# Altium PCB old(2).PcbDoc (part 2 of 4)
Units mil, origin at the board's own origin, x right, y up, seen from the top; angles counter-clockwise.
Board outline 5000 x 7000 mil, 4 copper layers (Top Layer, Signal Layer 1, Signal Layer 2, Bottom Layer), stack 61.2 mil thick; 559 components, 281 nets, 1477 pads, 685 vias.
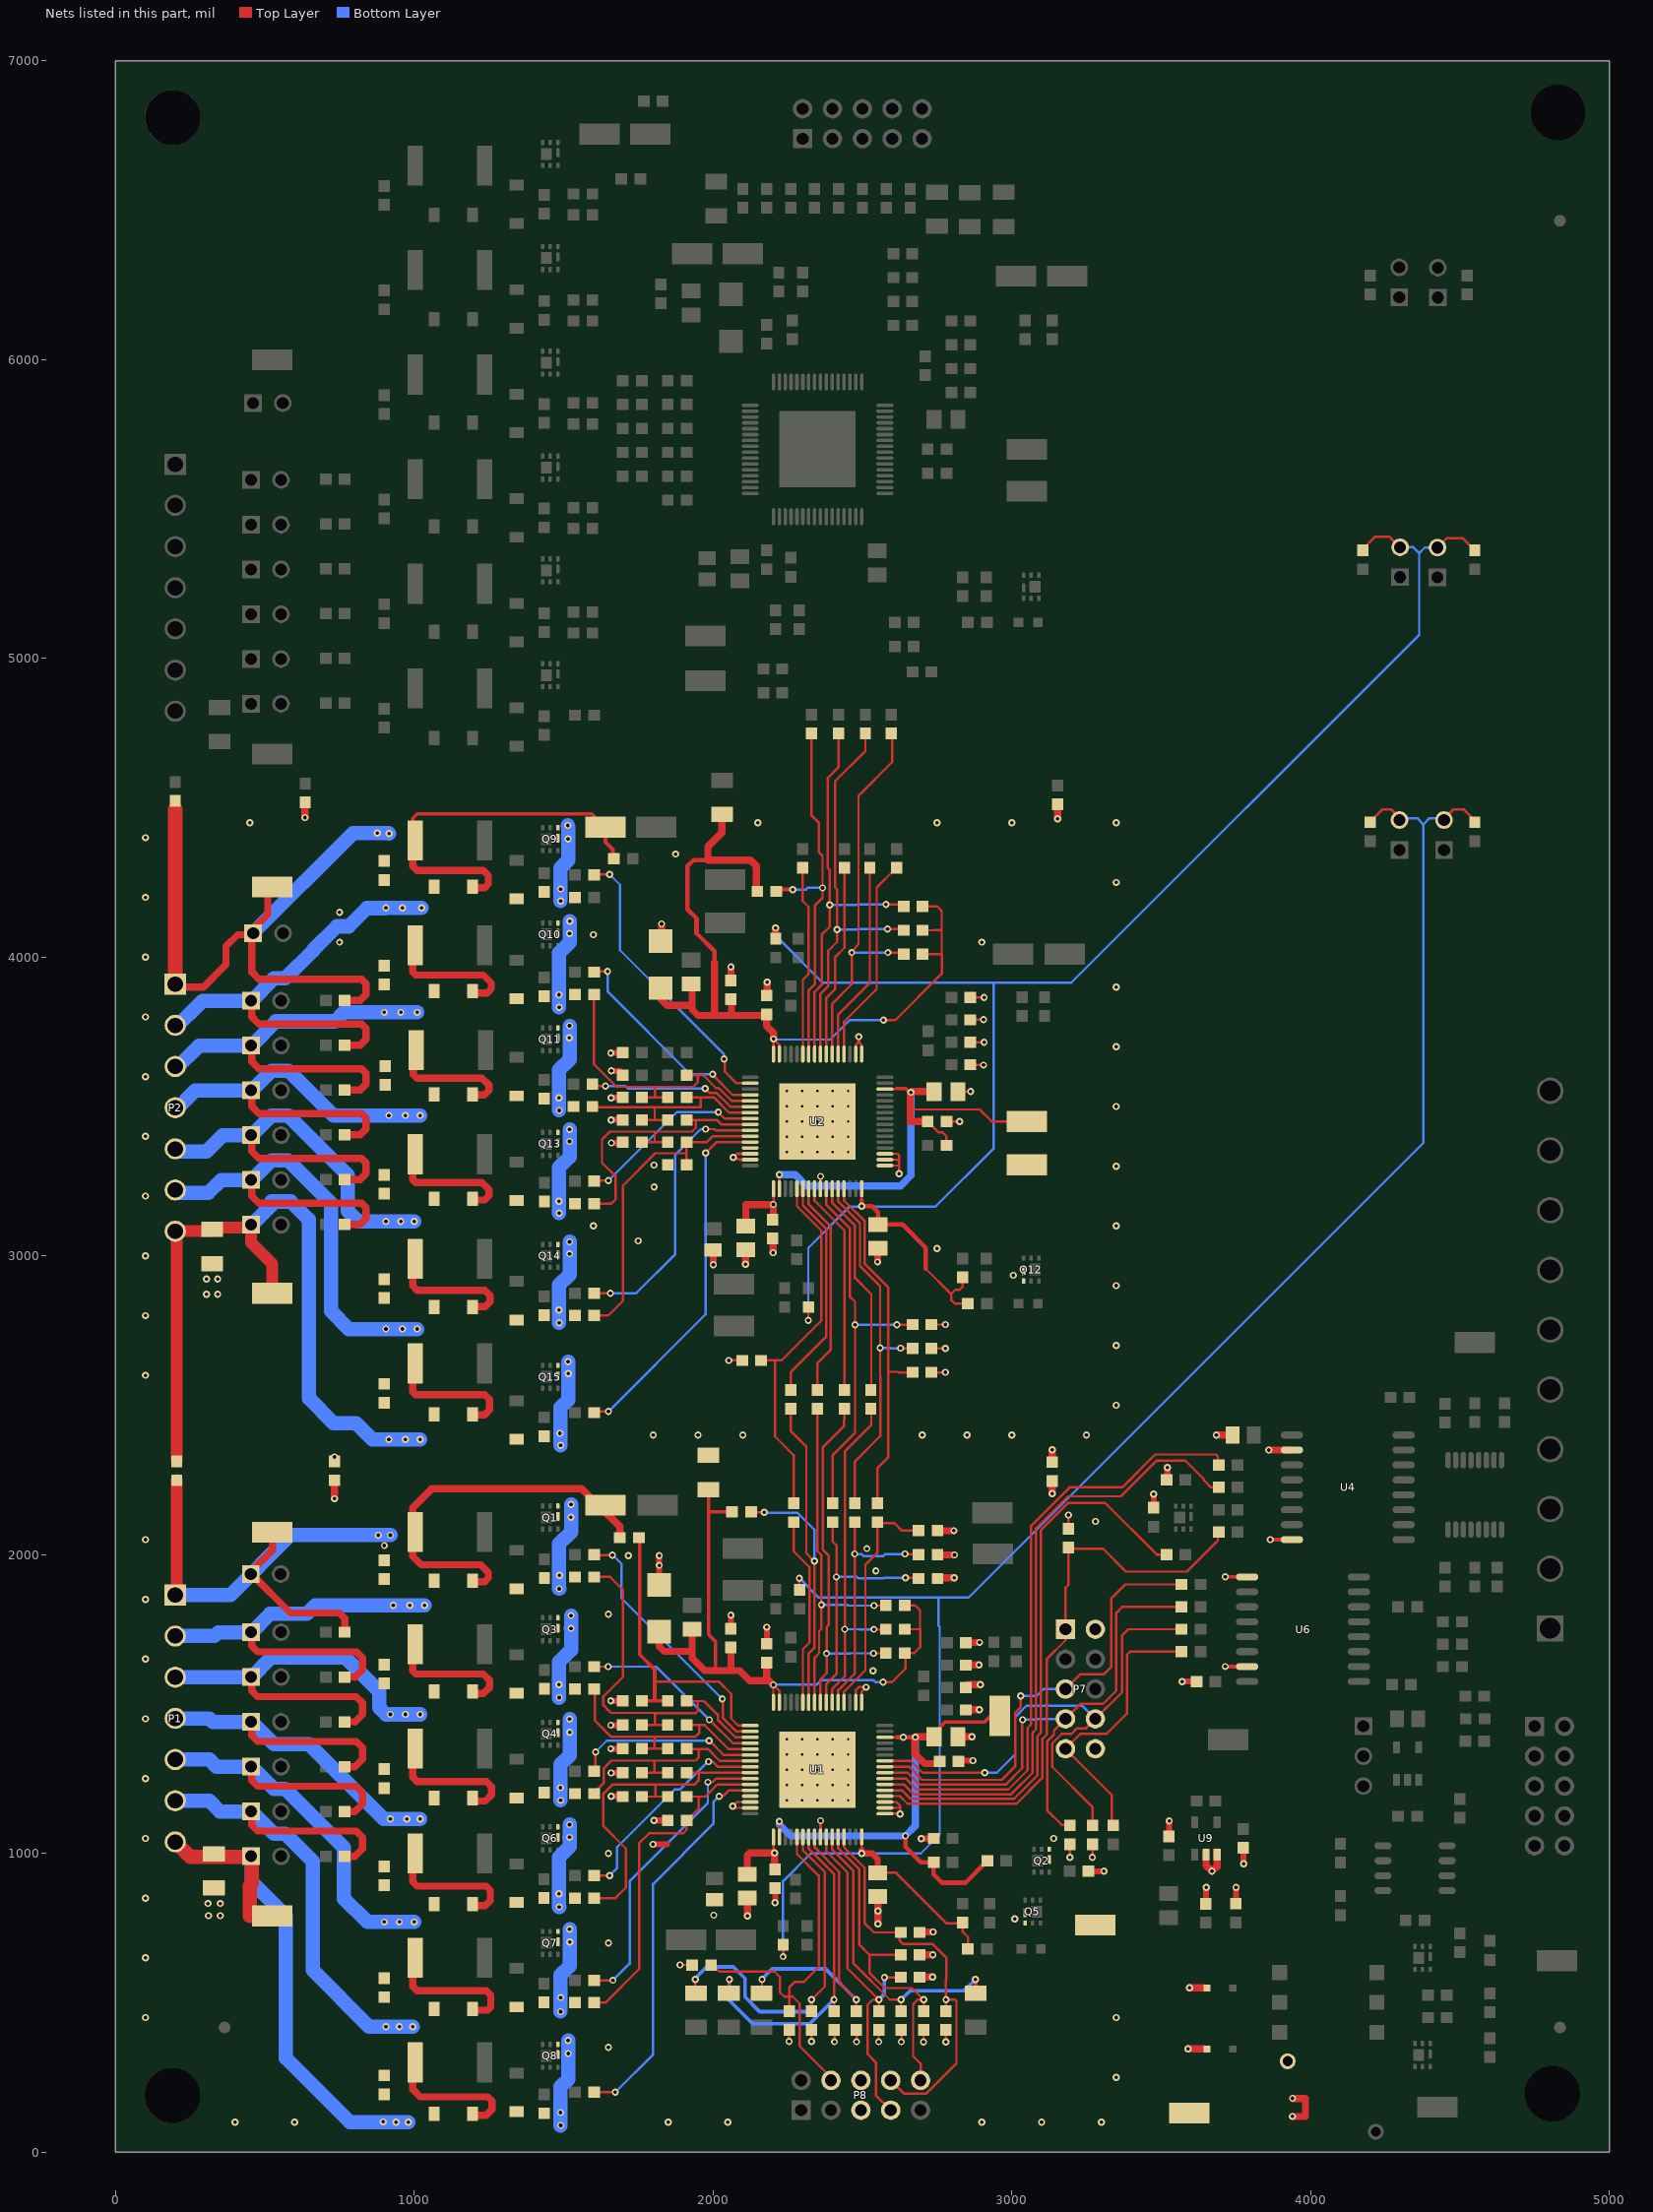
[diagram p4: the nets of this part, all layers, seen from the top]

## Part data
C1 C2 C3 C4 C5 C10 C11 C12 C13 C14 C17 C18 C20 C21 C25 C26 C28 C29 C40 C41 C42 C44 C46 C48 C51 C52 C54 C55 C57 C60 C66 C67 C78 C79 C80 C82 C84 C86 C89 C90 C92 C93 C95 C98 C100 C101 C107 C113 C114 C116 C118 C120 C121 C122 C123 C124 C125 C129 C132 C133: "CAP, CERM, 0.1 µF, 50 V, +/- 10%, X7R, 0603"
C6 C7 C8 C9: "CAP, CERM, 3300 pF, 50 V, +/- 10%, X7R, 0603"
C15 C16 C19 C24 C27 C30 C34 C49 C50 C53 C56 C61 C68 C69 C87 C88 C91 C94 C99 C102 C103: "CAP, CERM, 0.1 µF, 100 V, +/- 10%, X7R, 0603"
C22 C23 C58 C59 C96 C97: "CAP, CERM, 0.047 µF, 16 V, +/- 10%, X7R, 0603"
C31 C32 C33 C70 C71 C72 C104 C105 C106: "CAP, CERM, 0.1 µF, 16 V, +/- 10%, X7R, 0603"
C35 C36 C37 C38 C62 C63 C64 C65 C73 C74 C75 C76 C108 C109 C110 C111: "CAP, CERM, 33 pF, 50 V, +/- 5%, C0G/NP0, 0603"
C39 C77 C112 C126 C135: "CAP, CERM, 10 µF, 10 V, +/- 20%, X7R, 0805"
C43 C45 C47 C81 C83 C85 C115 C117 C119: "CAP, CERM, 2.2 µF, 10 V, +/- 10%, X7R, 0805"
C127: "CAP, CERM, 1 µF, 16 V, +/- 10%, X7R, 0603"
C128 C130 C131 C134: "CAP, CERM, 4.7 µF, 10 V, +/- 10%, X5R, 0603"
C136: "CAP, CERM, 150 pF, 50 V, +/- 5%, C0G/NP0, 0603"
C137: "CAP, CERM, 1000 pF, 3150 V, +80/-20%, E, Radial Disc D7x6mm"
"CAUTION 1": library part IEC_HighVoltage, "IEC 61010-1 High Voltage Warning"
D1 D2 D3: "LED, Yellow, SMD"
D4: "MOSFET, P-CH, -20 V, -20 A, SON 2x2mm"
D5 D6: "Diode, Schottky, 30 V, 0.2 A, SOD-323"
FID1 FID2 FID3: "Fiducial mark.  There is nothing to buy or mount."
H1 H2 H3 H4: "BRD SPT SNAP LOCK SCREW MNT 3/8\""
J1 J2 J3 J4 J5 J6 J7 J8 J9 JP1 JP2 JP3 JP4 JP5 JP6 JP7 JP8 JP9 JP10 JP11 JP12 JP13 JP14 JP15 JP16 JP17 JP18: "Header, 100mil, 2x1, Tin, TH"
JP19: "Header, 100mil, 3x1, Tin, TH"
L1: "Inductor, Wirewound, Ferrite, 10uH, 0.12A, 0.5 ohm, SMD"
LBL1: library part THT-14-423-10, "Thermal Transfer Printable Labels, 0.650\" W x 0.200\" H - 10,000 per roll"
Logo1: library part TI_Logo, "Texas Instrument Corporate Signature"
Logo2: library part Pb-Free
Logo3: library part FCC_disclaimer, "FCC_disclaimer"
P1 P2 P3: "Header(Shrouded), 3.5mm, 7x1,  R/A, TH"
P4 P5 P7 P8: "Header (shrouded), 100mil, 5x2, Gold, TH"
P6: "Header, 5.08mm, 10x1, Tin, TH"
Q1 Q2 Q3 Q4 Q5 Q6 Q7 Q8 Q9 Q10 Q11 Q12 Q13 Q14 Q15 Q16 Q17 Q18 Q19 Q20 Q21 Q22 Q23 Q24: "MOSFET, N-CH, 25 V, 5 A, SON 2x2mm"
R1 R10 R11 R12 R54 R55 R56 R65: "RES, 1.00 k, 1%, 0.25 W, 1206"
R2 R3 R4 R5 R6 R7 R8 R9 R20 R37 R57 R58 R59 R60 R61 R62 R63 R64 R94 R96 R99 R101 R103 R104 R105 R106 R108 R140 R141 R144 R146 R177 R179 R181 R184 R185 R198 R199 R200: "RES, 0, 5%, 0.1 W, 0603"
R13 R14 R15 R16 R17 R18 R30 R31 R32 R33 R34 R35 R47 R48 R49 R50 R51 R52: "RES, 1.0 k, 5%, 0.1 W, 0603"
R19 R29 R36 R46 R53: "RES, 0, 5%, 0.25 W, 1206"
R21 R22 R23 R24 R25 R26 R27 R28 R38 R39 R40 R41 R42 R43 R44 R45 R67 R69 R72 R73 R76 R79 R87 R92 R95 R98 R102 R109 R111 R114 R116 R118 R120 R122 R125 R131 R136 R138 R142 R145 R148 R151 R153 R155 R157 R159 R162 R164 R173 R175 R178 R182 R186 R202 R214: "RES, 1.00 k, 0.1%, 0.1 W, 0603"
R66 R74 R81 R93 R100 R110 R113 R119 R124 R133 R139 R147 R150 R156 R160 R167 R176 R183: "RES, 47, 5%, 1 W, 2512"
R68 R115 R152: "RES, 0, 5%, 0.125 W, 0805"
R70 R75 R80 R82 R83 R196 R207 R208 R209 R211: "RES, 10.0 k, 1%, 0.1 W, 0603"
R71 R78 R90 R97 R107 R112 R117 R121 R129 R137 R143 R149 R154 R158 R163 R174 R180 R187 R190 R191 R192 R195: "RES, 1.0 M, 5%, 0.1 W, 0603"
R77 R123 R161: "RES, 1.6 k, 5%, 0.1 W, 0603"
R84 R85 R127 R128 R165 R166: "RES, 1.47 k, 1%, 0.1 W, 0603"
R86 R126 R135 R168 R172 R204: "RES, 100 k, 1%, 0.1 W, 0603"
R88 R130 R171 R188 R189 R193 R194 R197 R201 R203 R205 R206: "RES, 100, 5%, 0.1 W, 0603"
R89 R91 R132 R134 R169 R170: "RES, 1.82 k, 1%, 0.1 W, 0603"
R210: "RES, 2.00, 1%, 0.1 W, 0603"
R212: "RES, 523 k, 1%, 0.1 W, 0603"
R213: "RES, 169 k, 1%, 0.1 W, 0603"
R215: "RES, 1.0, 5%, 0.1 W, 0603"
RT1 RT2 RT3 RT4 RT5 RT6: "Thermistor NTC, 10.0k ohm, 1%, 0603"
SH-J1 SH-J2 SH-J3 SH-J4 SH-J5 SH-J6 SH-J7 SH-J8 SH-JP1 SH-JP2 SH-JP3 SH-JP4 SH-JP5 SH-JP6 SH-JP7 SH-JP8 SH-JP9 SH-JP10 SH-JP11 SH-JP12 SH-JP13 SH-JP14 SH-JP15 SH-JP16 SH-JP17 SH-JP18 SH-JP19: "Shunt, 100mil, Gold plated, Black"
T1: "Transformer, 400 uH, SMT"
TP1 TP2 TP3 TP4 TP5 TP6 TP-1 TP-2 TP-3 TP-4 TP-5 TP-6 TP-7 TP-8 TP-9 TP-10 TP-11 TP-12 TP-13 TP-14 TP-15 TP-16 TP-17 TP-18 TP-19 TP-AGN TP-C1 TP-C2 TP-C3 TP-C4 TP-C5 TP-C6 TP-SW1 TP-VPROG1 TP-VPROG2 TP-VPROG3 TP-VSS1 TP-VSS2 TP-VSS3 TPTP-VSS1: "Test Point, Miniature, SMT"
TP-20: "LOW PROFILE, TH"
U1 U2 U3: "Lithium-Ion Battery Monitor and Secondary Protection IC for Electric and Hybrid, -40 to 85 degC, 64-pin HTQFP (PAP), Green (RoHS & no Sb/Br)"
U4 U6: "25 Mbps Quad Channels, 3 / 1, Digital Isolator, 3.3 V / 5 V, -40 to +125 degC, 16-pin SOIC (DW), Green (RoHS & no Sb/Br)"
U5: "Remote 8-Bit I2C and SMBus Low-Power I/O Expander with Reset and Configuration Registers, 2.3 to 5.5 V, -40 to 85 degC, 16-pin TSSOP (PW), Green (RoHS & no Sb/Br)"
U7: "Single Output LDO, 100 mA, Fixed 3.3 V Output, 2.7 to 10 V Input, with Low IQ, 5-pin SOT-23 (DBV), -40 to 125 degC, Green (RoHS & no Sb/Br)"
U8: "LOW POWER CURRENT MODE PUSH-PULL PWM, D0008A"
U9: "Ultralow-Power 100-mA Low-Dropout Linear Regulators, DBV0005A"
Z1 Z15 Z27: "Diode, TVS, Bi, 36 V, 400 W, SMA"
Z2 Z3 Z4 Z5 Z6 Z7 Z8 Z9 Z10 Z11 Z12 Z13 Z14 Z16 Z17 Z18 Z19 Z20 Z21 Z22 Z23 Z24 Z25 Z26 Z28 Z29 Z30 Z31 Z32 Z33 Z34 Z35 Z36 Z37 Z38 Z39: "Diode, Zener, 5.6 V, 500 mW, SOD-123"
ZZ1: library part AssemblyNoteLabel
ZZ2 ZZ3 ZZ4 ZZ5: library part AssemblyNote

## Via types
v1: diameter 24, hole 12, Top Layer to Bottom Layer, tented both sides, 607 vias
v2: diameter 19.68, hole 7.87, Top Layer to Bottom Layer, 75 vias
v3: diameter 22, hole 10, Top Layer to Bottom Layer, tented both sides, 3 vias

## Nets (pads, with @x,y where several pads share a name; then routed paths per layer and width w, separated by ;. In a path a pad name is that pad's centre, name@x,y a point inside that pad or via, vN(x,y) a via of type N, cw(c..) or ccw(c..) an arc to the next point about the centre after c; other vN are vias at no path point)
1-ALERT: R189.1 U1.38 | length 2099.8
  Top Layer w8: U1.38@2578.35,1230.79 2638.9,1230.79 2671.68,1198 2998,1198 3069.97,1269.97 3069.97,1403.6 3081.1,1414.73 3081.1,2088.02 3188.08,2195 3365,2195 3485,2315 3580.36,2315 3642.76,2252.6 3642.76,2249.24 3667,2225 R189.1@3690,2225
1-ALERT_N: C37.1 R39.1 U1.57 | length 1205.3
  Top Layer w8: U1.57@2340.16,1508.35 2340.16,1655.08 2355.13,1670.05 2355.13,1743.04 2363.13,1751.04 v1(2363.13,1832.04) 2363.13,1998.23 2350,2011.36 R39.1@2350,2485 ; v1(2538.91,1829.32) 2575,1829.32 C37.1@2575,1830
  Bottom Layer w8: v1(2363.13,1832.04) 2449.66,1832.04 2452.38,1829.32 v1(2538.91,1829.32)
1-ALERT_S: R55.2 R59.2 U1.23 | length 1144.9
  Top Layer w8: R55.2@2053,531.57 2055,533.57 v1(2055,578) ; U1.23@2320.47,1051.65 2320.47,1015.22 2405,930.69 v1(2405,510) R59.2@2405,475
  Bottom Layer w12: v1(2055,578) 2055,507 2132,430 2325,430 v1(2405,510)
1-CB1: R111.1 U1.12 | length 1316.4
  Top Layer w8: R111.1@1601.5,200 1601.72,200.22 v1(1672.75,200.22) ; v1@2022,1193 2036,1193 2054.1,1211.1 U1.12@2124.61,1211.1
  Bottom Layer w8: v1(1672.75,200.22) 1799.55,327.01 1799.55,897.05 2001.53,1099.03 2001.53,1171.96 v1@2020.61,1191.04
  other v1: 2020.96,1190.97
1-CB2: R102.1 U1.10 | length 1009
  Top Layer w8: R102.1@1601.5,575 v1@1664.93,575 ; v1@1979,1238 1998,1238 2010.47,1250.47 U1.10@2124.61,1250.47
  Bottom Layer w8: v1@1664.9,575 1721,631.1 1721,906.02 1982.96,1167.98 v1(1982.96,1237.97)
  other v1: 1664.96,574.97
1-CB3: R95.1 U1.8 | length 725
  Top Layer w8: R95.1@1601.5,925 1602.33,925.83 v1(1654.07,925.83) ; v1@1987,1308 1998,1308 2016.16,1289.84 U1.8@2124.61,1289.84
  Bottom Layer w8: v1(1654.07,925.83) 1679.49,951.25 1679.49,1020.91 1871.81,1213.24 1889.08,1213.24 v1@1982.46,1306.62
  other v1: 1984.96,1306.97
1-CB4: R87.1 U1.6 | length 618.8
  Top Layer w8: R87.1@1601.5,1275 1606.96,1280.46 v1(1606.96,1338.97) ; v1@1988,1377.31 2036.1,1329.21 U1.6@2124.61,1329.21
  Bottom Layer w8: v1@1606.55,1339.16 1644.36,1376.97 v1(1986.96,1376.97)
1-CB5: R76.1 U1.4 | length 628.8
  Top Layer w8: R76.1@1601.5,1625 v1@1648.93,1625 ; v1(1987.96,1446.97) 2066.42,1368.58 U1.4@2124.61,1368.58
  Bottom Layer w8: v1@1649.41,1624.83 1810.1,1624.83 v1(1987.96,1446.97)
  other v1: 1648.96,1624.97
1-CB6: R69.1 U1.2 | length 868.8
  Top Layer w8: R69.1@1601.5,2000 1603.53,1997.97 v1(1662.96,1997.97) ; v1@2032.65,1515.22 2032.65,1453.35 2078.05,1407.95 U1.2@2124.61,1407.95
  Bottom Layer w8: v1@1663.97,1998.87 1693.86,1968.98 1693.86,1854.07 v1(2030.96,1516.97)
1-CELL1: C34.2 C42.1 JP17.1 P1.6 Q7.4 Q7.7 R52.2 R107.1 R109.2 R110.2 Z10.2 Z11.2 Z12.1 | length 2632.2
  Top Layer w24: JP17.1@456,1140 456,1094 475.34,1074.66 805.63,1074.66 826.99,1053.3 826.99,1014.97 801.51,989.49 801,990 R52.2@770,990 ; R110.2@995,300 995,210 1020,185 1246.45,185 1259.94,171.51 1259.94,142.51 1240.14,122.71 1189.5,122.71 Z12.1@1189.5,125
  Bottom Layer w48: P1.6@200,1176.02 313.89,1176.02 349.91,1140 456,1140 531,1065 568.68,1065 660,973.68 660,608.43 848.43,420 v1(905,420) v1(950,420) v1(995,420) ; v1(1490,470) 1490,593 1520,623 1520,702.84 v1(1520.82,702.84) 1520,706 v1(1520,746)
  other v1: 1490.24,517.34
1-CELL2: C28.2 C34.1 JP16.1 P1.5 Q6.4 Q6.7 R51.2 R97.1 R98.2 R100.2 Z8.2 Z9.2 Z10.1 | length 2434.2
  Top Layer w24: JP16.1@456,1290 456,1244 475.34,1224.66 805.63,1224.66 826.99,1203.3 826.99,1164.97 801.51,1139.49 801,1140 R51.2@770,1140 ; R100.2@995,650 995,555 1010,540 1241.45,540 1256.21,525.24 1256.21,485.78 1245.43,475 Z10.1@1189.5,475
  Bottom Layer w48: P1.5@200,1313.81 313.89,1313.82 337.71,1290 456,1290 531,1215 568.68,1215 765,1018.68 765,848.43 843.43,770 v1(900,770) v1(950,770) v1(1000,770) ; v1(1485.15,820.54) 1485,824 1485,987 1520,1022 1520,1053.48 v1(1519.89,1053.48) 1520,1056 v1(1520,1096)
  other v1: 1484,864
1-CELL3: C25.2 C28.1 JP15.1 P1.4 Q4.4 Q4.7 R50.2 R90.1 R92.2 R93.2 Z6.2 Z7.2 Z8.1 | length 2257.2
  Top Layer w24: JP15.1@456,1440 456,1394 475.34,1374.66 805.63,1374.66 826.99,1353.3 826.99,1314.97 801.51,1289.49 801,1290 R50.2@770,1290 ; R93.2@995,1000 995,905 1010,890 1241.45,890 1254.55,876.9 1254.55,841.55 1238,825 Z8.1@1189.5,825
  Bottom Layer w48: P1.4@200,1451.61 313.89,1451.61 325.5,1440 456,1440 531,1365 647.44,1365 897.44,1115 v1(920,1115) v1(975,1115) v1(1020,1115) ; v1(1490,1177) 1490,1298 1520,1328 v1(1520,1449)
  other v1: 1489.5,1219.45 1520.15,1405.14
1-CELL4: C20.2 C25.1 JP14.1 P1.3 Q3.4 Q3.7 R49.2 R78.1 R79.2 R81.2 Z4.2 Z5.2 Z6.1 | length 2266.3
  Top Layer w24: JP14.1@456,1590 456,1544 475.34,1524.66 805.63,1524.66 826.99,1503.3 826.99,1464.97 801.51,1439.49 801,1440 R49.2@770,1440 ; R81.2@995,1350 995,1255 1010,1240 1241.45,1240 1258.28,1223.17 1258.28,1195.28 1238,1175 Z6.1@1189.5,1175
  Bottom Layer w48: P1.3@200,1589.41 331.6,1589.41 332.19,1590 456,1590 521,1655 770,1655 883,1542 883,1487.19 905.19,1465 v1(920,1465) v1(970,1465) v1(1020,1465) ; v1(1485,1521) 1485,1641 1525,1681 1525,1753.17 v1(1524.74,1753.17) 1525,1756 v1(1525,1796)
  other v1: 1484.41,1564.58
1-CELL5: C17.2 C20.1 JP13.1 P1.2 Q1.4 Q1.7 R48.2 R71.1 R72.2 R74.2 Z2.2 Z3.2 Z4.1 | length 2161.2
  Top Layer w24: JP13.1@456,1740 456,1694 475.34,1674.66 805.63,1674.66 826.99,1653.3 826.99,1614.97 801.51,1589.49 801,1590 R48.2@770,1590 ; R74.2@995,1700 995,1610 1005,1600 1231.45,1600 1251.65,1579.8 1251.65,1555.16 1231.35,1534.86 Z4.1@1199.36,1534.86
  Bottom Layer w48: P1.2@200,1727.2 331.6,1727.2 344.4,1740 456,1740 518,1802 640.34,1802 668.34,1830 v1(930,1830) v1(985,1830) v1(1035,1830) ; v1(1485.26,1885.34) 1485,1890 1485,2036 1525,2076 v1(1525,2168)
  other v1: 1486,1931 1524.45,2124.9
1-CELL6: C17.1 J1.1 P1.1 R37.1 R47.2 R66.2 R67.2 TP5.1 TP-C1.1 Z2.1 | length 3101.4
  Top Layer w24: J1.1@453,1935 453,1943 525,2015 TP5.1@525,2075 ; J1.1@455,1935 585.48,1804.52 750,1804.52 768.09,1786.43 768.09,1740 R47.2@770,1740 ; R66.2@995,2075 995,1994 1022.75,1966.25 1222.57,1966.25 1248.03,1940.78 1248.03,1921.31 1236.02,1909.3 Z2.1@1198.8,1909.3
  Top Layer w25: R66.2@995,2075 995,2156.5 1058.5,2220 1560,2220 1615,2165 1617,2165 1688.52,2093.48 R67.2@1688.52,2056.75
  Top Layer w40: P1.1@200,1865 205,1870 R37.1@205,2248.5
  Bottom Layer w48: P1.1@200,1865 385,1865 585,2065 v1(880,2065) v1(920,2065)
  other v1: 900,2030
1-CONV: P7.1 R83.1 R194.1 U1.36 | length 1977.4
  Top Layer w8: U1.36@2578.35,1191.42 2625.37,1191.42 2650.79,1166 3016,1166 3101.97,1251.97 3101.97,1382.55 3117.77,1398.35 3117.77,1650.7 3180,1712.93 P7.1@3180,1750 3180,1888.75 3190,1898.75 3190,2020 3305,2020 3382.18,1942.82 3585.82,1942.82 3690,2047 R194.1@3690,2075
1-CONV_N: R42.1 U1.59 | length 627.8
  Top Layer w8: R42.1@2270,2105 2270,2011.16 2323,1958.16 2323,1705.62 2300.79,1683.41 U1.59@2300.79,1508.35
1-CONV_S: C10.1 P8.4 R57.2 U1.21 | length 1345.7
  Top Layer w8: C10.1@1993.5,626 1999,626 2021,604 2206,604 2224,586 2224,535 2239,520 2255,520 ; R57.2@2255,475 2255,520 ; U1.21@2281.1,1051.65 2281.1,997.99 2354,925.1 2354,619 2305,570 2275,570 2255,550 2255,520 ; P8.4@2395,240 2395,250 2290,355 2290,497 2267,520 2255,520
1-CS_N: R45.1 R105.2 U1.52 | length 788.2
  Top Layer w8: U1.52@2438.58,1508.35 2438.58,1541 2510.12,1612.54 2510.12,1966.02 2550,2005.91 2550,2105 2607.5,2105 2632.5,2080 R105.2@2685,2080
1-CS_S: C13.1 P8.8 R64.2 U1.29 | length 1353.1
  Top Layer w8: U1.29@2438.58,1051.65 2438.58,1020.36 2507,951.94 2507,767 2539,735 2625,735 2625,707 2636.31,695.69 2735.74,695.69 2780.58,650.85 2780.58,580 2780,579.42 v1(2780,510) ; P8.8@2595,240 2640,195 2712.93,195 2815,297.07 2815,505 2810,510 v1(2780,510) ; R64.2@2780,475 v1(2780,510)
1-DRDY: R196.1 U1.37 | length 1905.2
  Top Layer w8: U1.37@2578.35,1211.1 2632.42,1211.1 2661.53,1182 3007,1182 3085.97,1260.97 3085.97,1391.82 3097.1,1402.95 3097.1,2081.43 3189.02,2173.35 3311.66,2173.35 3485.01,2000 R196.1@3515,2000
1-DRDY_N: C38.1 R38.1 U1.58 | length 1357.3
  Top Layer w8: C38.1@2130.67,2142.55 2130.67,2141.06 v1(2171.82,2141.06) ; R38.1@2260,2485 2260,2413.7 2312.5,2361.21 2312.5,2004.66 v1(2339.13,1978.02) 2339.13,1687.91 2320.47,1669.24 U1.58@2320.47,1508.35
  Bottom Layer w8: v1(2171.82,2141.06) 2171.82,2139.7 2283,2139.7 2339.13,2083.57 v1(2339.13,1978.02)
1-DRDY_S: R54.2 R58.2 U1.22 | length 1208.7
  Top Layer w8: v1(1941,578) 1941,534.57 R54.2@1943,532.57 ; U1.22@2300.79,1051.65 2300.79,1010.44 2374,937.23 2374,554 v1(2330,510) R58.2@2330,475
  Bottom Layer w12: v1(1941,578) 1941,582 1979,620 2068,620 2107,581 2107,519 2156,470 2313,470 2330,487 v1(2330,510)
1-FAULT: R188.1 U1.39 | length 2094.3
  Top Layer w8: U1.39@2578.35,1250.47 2644.95,1250.47 2681.42,1214 2989,1214 3053.2,1278.2 3053.2,1419.71 3065.1,1431.61 3065.1,2096.38 3193.72,2225 3370,2225 3480,2335 3683,2335 3690,2328 R188.1@3690,2300
1-FAULT_N: C36.1 R40.1 U1.56 | length 1221.4
  Top Layer w8: U1.56@2359.84,1508.35 2359.84,1582.4 2380.13,1602.68 v1(2380.13,1669.05) 2380.13,1757.04 2387.13,1764.04 2387.13,1996.86 2368,2015.99 2368,2359.86 2439.12,2430.98 2439.12,2452.05 2440,2452.93 R40.1@2440,2485 ; v1(2537.09,1669.32) 2575,1669.32 C36.1@2575,1670
  Bottom Layer w8: v1(2380.13,1669.05) 2458.48,1669.05 2458.75,1669.32 v1(2537.09,1669.32)
1-FAULT_S: R56.2 R60.2 U1.24 | length 1055.2
  Top Layer w8: R56.2@2163,531.57 2164,532.57 v1(2164,578) ; U1.24@2340.16,1051.65 2340.16,1020 2421.61,938.55 2421.61,568.39 v1(2480,510) R60.2@2480,475
  Bottom Layer w12: v1(2164,578) 2164,579 2198,613 2377,613 v1(2480,510)
1-LDOA: C44.1 C45.1 U1.17 | length 259.3
  Top Layer w8: v1@2202.36,1001.21 U1.17@2202.36,1051.65
  Top Layer w24: C45.1@2115,930 2115,992.77 2123.44,1001.21 2202.36,1001.21 v1(2205.7,1001.21) 2205.7,950 C44.1@2205,950
1-LDOD1: C46.1 C47.1 R70.2 R94.2 TP-VPROG1.1 U1.18 U1.46 | length 1845.4
  Top Layer w8: v1(2222,1107) v1(2222,1107) U1.18@2222.05,1054.61 ; U1.46@2575.39,1388.27 2616.11,1388.27
  Top Layer w12: C47.1@2740,1390 2740,1402.23 2777.77,1440 2910,1440 TP-VPROG1.1@2960,1490
  Top Layer w15: v1(2643.85,1058.21) 2643.85,1021.75 2695.6,970 R94.2@2738.5,970 2738.5,929.58 2766.62,901.46 2844.96,901.46 R70.2@2918.5,975
  Top Layer w16: 2616.11,1388.27 2636.56,1388.27 v1(2637,1388) 2636.56,1388.32 2636.56,1388.46 v1@2670.48,1388.46 ; v1@2676,1384.02 2671.02,1389 v1(2677,1389)
  Top Layer w24: v1@2676,1384.02 2676,1332.22 2708.22,1300 C46.1@2755,1300 ; v1(2677,1389) 2678,1390 C47.1@2740,1390
  Bottom Layer w24: v1(2222,1107) 2222,1097.03 2260.82,1058.21 v1(2643.85,1058.21) 2677,1091.36 v1(2677,1389)
1-REG50: C22.1 C23.1 C43.1 J2.2 J3.2 R77.2 R86.2 RT1.2 RT2.2 U1.32 | length 6598.8
  Top Layer w8: v1(2234.61,654.07) 2234.61,693.11 C22.1@2235,693.5 ; v1(2289,1921) 2289,1884.5 2291,1882.5 C23.1@2290,1881.5 ; U1.32@2497.64,1054.61 2497.77,1054.47 v1@2497.77,1009.77 ; C43.1@2551,935 2612.5,935 2782.5,765 R86.2@2835,765 ; R86.2@2835,768.5 R86.2@2835,765 ; R77.2@2853.5,680 2853.5,719.5 2835,738 R86.2@2835,765 ; RT2.2@4200,4440 4200,4454 4240,4494 4271,4494 J3.2@4300,4465 ; J2.2@4449.15,4465.85 4477.31,4494 4514,4494 4550,4458.01 RT1.2@4550,4440
  Top Layer w20: v1@2497.77,1009.77 v1(2497.77,999.51) 2532.49,999.51 2551,981 C43.1@2551,935
  Top Layer w24: C23.1@2290,1877 C23.1@2291.03,1877
  Bottom Layer w8: v1(2234.61,654.07) 2234.61,906.67 2327.45,999.51 v1(2497.77,999.51) 2695.51,999.51 2759,1063 2759,1758.81 2754.53,1763.28 2754.53,1856.04 ; v1(2289,1921) 2353.96,1856.04 2754.53,1856.04 ; J3.2@4300,4465 4359.43,4465 4377.62,4443.77 ; J2.2@4450,4465 4398.85,4465 4377.62,4443.77 ; 2754.53,1856.04 2855.46,1856.04 4377.62,3378.2 4377.62,4443.77
1-SCLK_N: R43.1 R103.2 U1.55 | length 892.8
  Top Layer w8: U1.55@2379.53,1508.35 2379.53,1566.62 2413.13,1600.22 v1(2413.13,1925.03) 2413.13,2031.18 2400,2044.31 R43.1@2400,2105 ; v1(2644.1,1922.03) 2685,1922.03 R103.2@2685,1920
  Bottom Layer w8: v1(2413.13,1925.03) 2482.08,1925.03 2487.11,1920 2570.01,1920 2572.04,1922.03 v1(2644.1,1922.03)
1-SCLK_S: C11.1 P8.7 R61.2 U1.26 | length 1212.6
  Top Layer w8: U1.26@2379.53,1051.65 2379.53,1006.34 2450,935.86 2450,615 v1(2555,510) ; R61.2@2555,475 v1(2555,510) ; v1(2574.05,584.02) 2625,584.02 C11.1@2625,585 ; P8.7@2595,140 2545,190 2545,300 2517.42,327.58 2517.42,492.42 2535,510 v1(2555,510)
  Bottom Layer w12: v1(2555,510) 2574.05,529.05 v1(2574.05,584.02)
1-SDI_N: R44.1 R104.2 U1.53 | length 838.6
  Top Layer w8: U1.53@2418.9,1508.35 2418.9,1545.92 2474.12,1601.14 v1(2474.12,2002.02) 2474.12,2051.57 2475,2052.45 R44.1@2475,2105 ; v1(2643.1,2002.02) 2685,2002.02 R104.2@2685,2000
  Bottom Layer w8: v1(2474.12,2002.02) 2496.58,2002.02 2503.6,1995 2570.01,1995 2577.03,2002.02 v1(2643.1,2002.02)
1-SDI_S: C12.1 P8.10 R63.2 U1.28 | length 1156.1
  Top Layer w8: U1.28@2418.9,1051.65 2418.9,1017.37 2489.82,946.45 2489.82,694.02 2523.84,660 ; C12.1@2625,660 2523.84,660 ; P8.10@2695,240 2695,295.78 2670,320.78 2670,495 2685,510 v1(2705,510) ; R63.2@2705,475 v1(2705,510) ; 2523.84,660 2523.84,600.29 2575.13,549 2666,549 v1(2705,510)
1-SDO_N: C35.1 R41.1 U1.54 | length 1165
  Top Layer w8: U1.54@2399.21,1508.35 2399.21,1550.84 2441.12,1592.75 v1(2441.12,1750.04) 2441.12,2344.65 2530,2433.53 R41.1@2530,2485 ; v1(2538.46,1749.78) 2575,1749.78 C35.1@2575,1750
  Bottom Layer w8: v1(2441.12,1750.04) 2489.66,1750.04 2489.92,1749.78 v1(2538.46,1749.78)
1-SDO_S: R62.2 R65.2 U1.27 | length 1017.8
  Top Layer w8: U1.27@2399.21,1051.65 2399.21,1012.36 2470,941.57 2470,631.5 2591.5,510 v1(2630,510) R62.2@2630,475
  Top Layer w12: v1(2878,578) 2879,577 R65.2@2879,531.57
  Bottom Layer w12: v1(2630,510) 2660,540 2840,540 v1(2878,578)
1-SPI-MISO: P7.5 R206.2 U1.41 | length 1536.5
  Top Layer w8: U1.41@2578.35,1289.84 2656.17,1289.84 2700.01,1246 2966,1246 3012.19,1292.19 3012.19,1471.41 3030.42,1489.64 v1(3030.42,1526.65) ; P7.5@3180,1550 3230,1600 3309,1600 3332.47,1623.47 3332.47,1852.47 3380,1900 R206.2@3565,1900
  Bottom Layer w8: v1(3030.42,1526.65) 3083.29,1526.65 3106.64,1550 P7.5@3180,1550
1-SPI-MOSI: P7.8 R82.1 R201.2 U1.42 | length 1932.5
  Top Layer w8: U1.42@2578.35,1309.53 2661.93,1309.53 2701.46,1270 v1(2910.15,1270) ; R82.1@3265,1095 3270,1100 3270,1155.03 3135.5,1289.53 3135.5,1368.43 3167.07,1400 3200.15,1400 3218.83,1418.68 3248.68,1418.68 P7.8@3280,1450 3370,1540 3370,1730 3390,1750 R201.2@3565,1750
  Bottom Layer w8: v1(2910.15,1270) 2950,1270 3010.97,1330.97 3010.97,1455.6 3049.87,1494.5 3235.5,1494.5 P7.8@3280,1450
1-SPI-SCLK: P7.7 R80.1 R203.2 U1.40 | length 1923.9
  Top Layer w8: U1.40@2578.35,1270.16 2651.01,1270.16 2691.17,1230 2980,1230 3035,1285 3035,1445.69 v1(3036.44,1447.13) ; R80.1@3195,1095 3167,1095 3119.5,1142.5 3119.5,1376.02 3141.15,1397.67 3141.15,1411.15 P7.7@3180,1450 3230,1500 3305,1500 3349.97,1544.97 3349.97,1804.97 3370,1825 R203.2@3565,1825
  Bottom Layer w8: v1(3036.44,1447.13) 3083.29,1447.13 3086.16,1450 P7.7@3180,1450
1-SPI-SS: P7.9 R73.1 R197.2 | length 954.2
  Top Layer w8: R73.1@3335,1095 3335,1195 P7.9@3180,1350 3230,1400 3318,1400 3386,1468 3386,1665 3396,1675 R197.2@3565,1675
1-VBAT: C16.1 C35.2 C36.2 C37.2 C38.2 C41.1 R46.1 R68.2 U1.63 U1.64 Z1.2 | length 2336.9
  Top Layer w8: U1.64@2202.36,1508.35 2201.91,1508.8 v1(2201.91,1564.12) 2222.05,1543.98 U1.63@2222.05,1508.35 ; v1(2569.42,1572.72) 2598.46,1572.72 2645,1619.26 2645,1670 2673.68,1670 2693.45,1689.78 2693.45,1749.78 2693,1750.23 ; C35.2@2645,1750 2645,1750.23 2693,1750.23 ; C37.2@2645,1830 2676.41,1830 2693,1813.41 2693,1750.23
  Top Layer w12: 1985,2142.55 C38.2@2060.67,2142.55 ; R46.1@1985,2217.91 1985,1732.34 2008.94,1708.4 2008.94,1611.69
  Top Layer w24: Z1.2@1820,1750.5 1820,1692.33 1836.19,1676.14 1930,1676.14 ; R68.2@1930,1755 1930,1676.14 ; C16.1@2060,1685 2060,1611.69 ; C41.1@2180,1635 2180,1585.32 ; v1(2201.91,1564.12) 2201.55,1563.77 2180,1585.32 ; 1930,1676.14 1930,1653.87 1972.18,1611.69 2008.94,1611.69 2060,1611.69 ; 2060,1611.69 2089,1611.69 2122.69,1578 2180,1578 2180,1585.32
  Bottom Layer w8: v1(2201.91,1564.12) 2347.11,1564.12 2362.99,1580 2537,1580 2544.28,1572.72 v1(2569.42,1572.72)
1-VC0: C8.1 C9.2 C10.2 C11.2 C12.2 C13.2 C14.2 C16.2 C18.2 C21.2 C26.2 C29.2 C31.2 C32.2 C39.2 C40.2 C41.2 C42.2 C43.2 C44.2 C45.2 C46.2 C47.2 C120.2 C123.2 C130.2 C131.2 C132.2 C135.2 C137.2 D5.2 D6.2 JP18.1 P1.7 P7.2 P7.10 P8.5 P8.6 Q2.4 Q2.7 Q5.4 Q5.7 Q8.4 Q8.7 R53.1 R53.2 R57.1 R58.1 R59.1 R60.1 R61.1 R62.1 R63.1 R64.1 R75.1 R80.2 R82.2 R83.2 R96.1 R101.2 R103.1 R104.1 R105.1 R108.2 R112.1 R202.1 R213.1 TP6.1 TP-VSS1.1 TP-VSS3.1 U1.13 U1.14 U1.15 U1.25 U1.33 U1.34 U1.35 U1.49 U1.50 U1.65 U4.2 U4.8 U6.9 U6.15 U9.2 U9.3 Z1.1 Z12.2 Z13.2 | length 5491.2
  Top Layer w8: v1(1890.07,626.39) 1926,626.39 C10.2@1926,626 ; U1.15@2124.61,1152.05 2071.95,1152.05 v1(2066,1158) 2079.73,1171.73 U1.14@2124.61,1171.73 ; v1(2254.61,370.07) R57.1@2254.61,406 ; v1(2329.61,370.07) R58.1@2329.61,406 ; v1(2406.61,369.07) R59.1@2406.61,405 ; U1.50@2477.95,1505.39 2477.95,1545.95 2488,1556 v1(2513,1556) 2497.64,1540.64 U1.49@2497.64,1505.39 ; v1(2480.61,369.07) R60.1@2480.61,405 ; v1(2554.61,369.07) R61.1@2554.61,405 ; U1.33@2575.39,1132.36 v1@2624.64,1132.36 ; U1.34@2575.39,1152.05 2623.95,1152.05 2624.64,1151.36 ; U1.35@2575.39,1171.73 2614.27,1171.73 2626,1160 v1(2626,1131) ; v1(2630.61,369.07) R62.1@2630.61,405 ; v1(2704.61,368.07) R63.1@2704.61,404 ; v1(2779.61,368.07) R64.1@2779.61,404 ; R83.2@3190,2090 v1(3190,2132.48) ; v1(3194.93,986.71) 3194.93,1025 R80.2@3195,1025 ; v1(3269.93,986.71) 3269.93,1025 R82.2@3270,1025
  Top Layer w10: U1.25@2359.84,1054.61 2359.84,1108.84 v1(2360,1109)
  Top Layer w12: v1(3714.8,1625.2) 3714.9,1625.1 U6.15@3785.4,1625.1 ; v1(3714.8,1925.2) 3714.9,1925.1 U6.9@3785.4,1925.1 ; v1(3865,2050) 3865.1,2049.9 U4.8@3935.6,2049.9
  Top Layer w20: v1(1658,1350) C21.2@1700.5,1350 ; v1(1658,1429) C18.2@1700.5,1429 ; v1(1658,1510) C14.2@1700.5,1510 ; v1(1659,1191) C29.2@1701.5,1191 ; v1(1659,1269) C26.2@1701.5,1269 ; v1(1799.52,1030) 1845.5,1030 ; v1(1802.52,1110) C40.2@1848.5,1110 ; Z1.1@1820,1898.74 v1(1820,1964) v1(1820,1996) ; C39.2@2003,842.57 C39.2@2005,844.57 ; C16.2@2060,1751.5 v1(2060,1797) ; C41.2@2180,1704.43 v1(2180,1757) ; v1(2208,835) C44.2@2208,883.5 ; v1(2697,1049) 2737.5,1049 R96.1@2738.5,1050 ; C46.2@2821.5,1308 2823.5,1310 v1(2870,1310) ; R75.1@3256.5,940 v1(3309,940) ; C120.2@3475,2156.5 v1(3475,2202) ; R202.1@3518.5,2250 3521,2252.5 v1(3521,2291) ; C130.2@3526,1056.5 3527,1057.5 v1(3527,1108) ; v1(3570,1575) C123.2@3618.5,1575 ; C132.2@3650,830.5 3651,831.5 v1(3651,886) ; C131.2@3750,831.5 3751,832.5 v1(3751,886) ; R213.1@3775,1018.5 3776,1017.5 v1(3776,965)
  Top Layer w24: v1(733,2187) 733,2222 ; C45.2@2115,850 2115.21,850 v1(2115.21,790.72) ; v1(2552,764) v1(2552,807) C43.2@2552,858 ; C11.2@2686.31,585.97 v1(2734.74,585.97) ; C12.2@2687.31,659.97 v1(2735.74,659.97) ; C13.2@2688.31,736.97 v1(2736.74,736.97) ; R105.1@2758,2081 2758,2079.97 v1(2806.43,2079.97) ; R103.1@2759,1923.2 2759,1922.17 v1(2807.43,1922.17) ; R104.1@2760,2000 2760,1998.97 v1(2808.43,1998.97) ; C47.2@2820,1390 2820,1389.76 v1(2866.76,1389.76) v1@2866.76,1390.04 ; R108.2@2842,1557 2842,1555.97 2851.03,1565 v1(2895,1565) ; R101.2@2842,1632 2842,1630.97 v1(2890.43,1630.97) ; C31.2@2843,1482 2843,1480.97 v1(2891.43,1480.97) ; C32.2@2844,1707 2844,1705.97 v1(2892.43,1705.97) ; v1@3135,2203 C9.2@3135.04,2243 ; v1(3590,345) D5.2@3642.5,345 ; v1(3595,550) D6.2@3642.5,550 ; U9.2@3650,1005 3650,960 v1(3670,940) 3685,955 3687,955 U9.3@3687,1005 ; v1(3685,2400) C135.2@3735,2400 ; v1(3860,2350) 3860.1,2349.9 U4.2@3935.6,2349.9 ; v1(3939.3,119.12) 3983.5,119.12 3983.5,179.39 3940.07,179.39 v1(3940.07,179.64)
  Top Layer w48: P1.7@200,1038.22 250.23,988 456,988 456,896.75 450,890.75 450,790
  Bottom Layer w48: JP18.1@456,990 456,904.32 570,790.32 570,315 785,100 v1(939,100) v1(980,100) ; v1(1490,89) 1490,219 1515,244 v1(1515,373)
  other v1: 400,100 600,100 1850,100 2050,100 2900,100 3100,100 3300,100 896,101 1489.84,132.25 3350,250 1515.19,329.82 1650,350 100,450 3350,450 100,650 1650,700 3010,780 311,791 351,791 2002.52,793 310,832 351,832 100,850 1650,1000 100,1050 3140,1050 100,1250 100,1450 100,1650 1650,1800 100,1850 1717,1996 100,2050 3280.82,2111.15 3135,2204
  other v2: 2247.64,1177.64 2298.82,1177.64 2350,1177.64 2401.18,1177.64 2452.36,1177.64 2247.64,1228.82 2298.82,1228.82 2350,1228.82 2401.18,1228.82 2452.36,1228.82 2247.64,1280 2298.82,1280 2350,1280 2401.18,1280 2452.36,1280 2247.64,1331.18 2298.82,1331.18 2350,1331.18 2401.18,1331.18 2452.36,1331.18 2247.64,1382.36 2298.82,1382.36 2350,1382.36 2401.18,1382.36 2452.36,1382.36
1-VC1: C30.2 C40.1 R109.1 U1.11 | length 1154.7
  Top Layer w8: R109.1@1601.5,500 1640,500 1752.42,612.42 1752.42,1032.82 1786.08,1066.48 1899.48,1066.48 1911.5,1078.5 C40.1@1911.5,1110 1912.45,1110 1952,1149.55 1952,1190 ; C30.2@1911.5,1190 1952,1190 ; U1.11@2124.61,1230.79 2014.95,1230.79 1974.17,1190 1952,1190
1-VC2: C27.2 C29.1 C30.1 R98.1 U1.9 | length 1153.1
  Top Layer w8: R98.1@1605,850 1673.26,850 1708.43,885.17 1708.43,1016.24 1633.31,1091.35 1633.31,1199.94 1663.2,1229.83 1807.29,1229.83 1938.06,1229.83 1952.12,1243.89 1952.12,1270.33 ; C29.1@1765,1190 1806.73,1190 ; 1806.73,1229.27 1806.73,1190 ; C30.1@1845,1190 1806.73,1190 ; C27.2@1915,1270.33 1952.12,1270.33 ; 2028.96,1270.33 1952.12,1270.33 ; 2029.13,1270.16 U1.9@2121.65,1270.16
1-VC3: C24.2 C26.1 C27.1 R92.1 U1.7 | length 803.3
  Top Layer w8: R92.1@1605,1200 1605,1206 1635,1236 1635,1284.94 1660.32,1310.26 1805.89,1310.26 1942.28,1310.26 1952.12,1320.1 1952.12,1349.35 ; C26.1@1765,1270 1804.48,1270 ; 1804.48,1308.86 1804.48,1270 ; C27.1@1845,1270 1804.48,1270 ; C24.2@1915,1349.35 1952.12,1349.35 ; U1.7@2124.61,1309.53 2022.96,1309.53 1983.13,1349.35 1952.12,1349.35
1-VC4: C19.2 C21.1 C24.1 R79.1 U1.5 | length 867.5
  Top Layer w8: R79.1@1605,1550 1605,1443.57 1646.13,1402.45 1658.17,1390.41 1941.44,1390.41 1953.53,1402.5 1953.53,1428.94 ; C21.1@1765,1350 1804.76,1350 ; 1804.76,1389.29 1804.76,1350 ; C24.1@1845,1350 1804.76,1350 ; C19.2@1915,1428.94 1953.53,1428.94 ; U1.5@2121.65,1348.9 2052.1,1348.9 1972.06,1428.94 1953.53,1428.94
1-VC5: C15.2 C18.1 C19.1 R72.1 U1.3 | length 1272.6
  Top Layer w8: R72.1@1605,1925 1655.83,1925 1698.46,1882.36 1698.46,1590.46 1633,1524.99 1633,1496.01 1652.11,1476.89 1658.99,1470 1806,1470 ; C18.1@1765,1430 1805.32,1430 ; 1805.32,1468.59 1805.32,1430 ; 1806.45,1469.72 1942.28,1469.72 1949.59,1477.03 1949.59,1509.65 ; C19.1@1845,1430 1805.32,1430 ; C15.2@1915,1509.65 1949.59,1509.65 ; U1.3@2121.65,1388.27 2074.73,1388.27 2016,1447 2016,1463.87 1970.22,1509.65 1949.59,1509.65
1-VC6: C14.1 C15.1 R67.1 U1.1 | length 1082.2
  Top Layer w8: 1805.83,1575.17 2019.05,1575.17 2061,1533.22 2061,1451 2084.36,1427.64 U1.1@2124.61,1427.64
  Top Layer w12: R67.1@1755.02,2056.45 1755.02,1664.98 1805,1615 1805,1510 ; C14.1@1761.5,1510 1805,1510 ; C15.1@1848.5,1510 1805,1510
2-ALERT_N: C63.2 R21.1 U2.57 | length 1355.8
  Top Layer w8: U2.57@2340.16,3678.35 2340.16,3883.21 2363.89,3906.95 2363.89,4075.31 2390.49,4101.9 v1(2390.49,4175.18) 2390.49,4208.36 2390.82,4208.69 2390.82,4291.5 2384.57,4297.75 2384.57,4600 2420,4635.43 R21.1@2420,4745 ; v1(2579.03,4176.02) 2635,4176.02 C63.2@2635,4170
  Bottom Layer w8: v1(2390.49,4175.18) 2484.34,4175.18 2485.18,4176.02 v1(2579.03,4176.02)
2-ALERT_S: R39.2 U2.23 | length 715.7
  Top Layer w8: U2.23@2320.47,3221.65 2320.47,3172.06 2394.5,3098.03 2394.5,2685.86 2350,2641.36 R39.2@2350,2555
2-CB1: R148.1 U2.12 | length 1214.8
  Top Layer w8: R148.1@1601.5,2475 1605.5,2479 v1(1650,2479) ; v1(1975,3344) 2012.1,3381.1 U2.12@2124.61,3381.1
  Bottom Layer w8: v1(1650,2479) 1975,2804 v1(1975,3344)
2-CB2: R142.1 U2.10 | length 947.2
  Top Layer w8: R142.1@1601.5,2875 v1(1656.58,2875.02) ; v1(1975,3424.11) 2003.89,3424.11 2007.53,3420.47 U2.10@2124.61,3420.47
  Bottom Layer w8: v1(1656.58,2875.02) 1743.1,2875.02 1873.88,3005.8 1873.88,3338.88 1959.11,3424.11 v1(1975,3424.11)
2-CB3: R136.1 U2.8 | length 624.7
  Top Layer w8: R136.1@1603.5,3252 v1(1650,3252) ; v1(2017.69,3481.01) 2038.86,3459.84 U2.8@2124.61,3459.84
  Bottom Layer w8: v1(1650,3252) 1879.01,3481.01 v1(2017.69,3481.01)
2-CB4: R125.1 U2.6 | length 559.5
  Top Layer w8: R125.1@1596.5,3575 1603.5,3568 v1(1640,3568) ; v1(1974,3560.02) 1988.02,3546 2011.43,3546 2058.21,3499.21 U2.6@2124.61,3499.21
  Bottom Layer w8: v1(1640,3568) 1707,3568 1714.98,3560.02 v1(1974,3560.02)
2-CB5: R120.1 U2.4 | length 736.2
  Top Layer w8: R120.1@1601.5,3950 1603.5,3952 v1(1647,3952) ; v1(1999,3608) 1999,3605 2065.42,3538.58 U2.4@2124.61,3538.58
  Bottom Layer w8: v1(1647,3952) 1647,3885 1924,3608 v1(1999,3608)
2-CB6: R116.1 U2.2 | length 971.8
  Top Layer w8: R116.1@1603.5,4277 v1(1654,4277) ; v1(2037,3659) 2039.94,3656.06 2039.94,3616.06 2078.05,3577.95 U2.2@2124.61,3577.95
  Bottom Layer w8: v1(1654,4277) 1688.58,4242.42 1688.58,4022.97 2037,3674.55 v1(2037,3659)
2-CELL1: C69.2 C80.1 JP11.1 P2.6 Q14.4 Q14.7 R35.2 R143.1 R145.2 R147.2 Z23.2 Z24.2 Z25.1 | length 2630.3
  Top Layer w24: JP11.1@456,3254 456,3200.35 480.05,3176.3 823.52,3176.3 838.27,3161.55 838.27,3124.89 818.38,3105 R35.2@770,3105 ; R147.2@995,2640 995,2545 1005,2535 1236.45,2535 1252.13,2519.32 1252.13,2485 1235.22,2468.09 1189.5,2468.09 Z25.1@1189.5,2480
  Bottom Layer w48: P2.6@200,3211.02 310.41,3211.02 353.39,3254 456,3254 522,3320 577.68,3320 721,3176.68 721,2815 781,2755 v1(905,2755) v1(960,2755) v1(1010,2755) ; v1(1485,2776) 1485,2903 1520,2938 v1(1520,3007) v1(1520,3047)
  other v1: 1484.32,2818.49
2-CELL2: C66.2 C69.1 JP10.1 P2.5 Q13.4 Q13.7 R34.2 R137.1 R138.2 R139.2 Z21.2 Z22.2 Z23.1 | length 2382.8
  Top Layer w24: JP10.1@456,3404 456,3350.35 480.05,3326.3 823.52,3326.3 838.27,3311.55 838.27,3274.89 818.38,3255 R34.2@770,3255 ; R139.2@995,2990 995,2900 1010,2885 1236.45,2885 1254.14,2867.31 1254.14,2846.14 1238,2830 Z23.1@1189.5,2830
  Bottom Layer w48: P2.5@200,3348.82 304.31,3348.82 359.49,3404 456,3404 522,3470 577.68,3470 777,3270.68 777,3150 812,3115 v1(905,3115) v1(955,3115) v1(1000,3115) ; v1(1485,3143) 1485,3297 1520,3332 v1(1520,3383) v1(1520,3423)
  other v1: 1484,3183
2-CELL3: C57.2 C66.1 JP9.1 P2.4 Q11.4 Q11.7 R33.2 R129.1 R131.2 R133.2 Z19.2 Z20.2 Z21.1 | length 2247.4
  Top Layer w24: JP9.1@456,3554 456,3500.35 480.05,3476.3 823.52,3476.3 838.27,3461.55 838.27,3424.89 818.38,3405 R33.2@770,3405 ; R133.2@995,3340 995,3255 1005,3245 1226.45,3245 1250.13,3221.32 1250.13,3202.07 1235.3,3187.24 1189.5,3187.24 Z21.1@1189.5,3180
  Bottom Layer w48: P2.4@200,3486.61 267.39,3554 456,3554 522,3620 580,3620 730,3470 v1(915,3470) v1(970,3470) v1(1020,3470) ; v1(1485,3487) 1485,3623 1520,3658 v1(1520,3770)
  other v1: 1484.44,3528.57 1519,3730
2-CELL4: C54.2 C57.1 JP8.1 P2.3 Q10.4 Q10.7 R32.2 R121.1 R122.2 R124.2 Z17.2 Z18.2 Z19.1 | length 2194.7
  Top Layer w24: JP8.1@456,3704 456,3650.35 480.05,3626.3 823.52,3626.3 838.27,3611.55 838.27,3574.89 818.38,3555 R32.2@770,3555 ; R124.2@997,3689 997,3607 1009,3595 1226.45,3595 1250.13,3571.32 1250.13,3554.31 1234.95,3539.13 1198.63,3539.13 Z19.1@1189.5,3530
  Bottom Layer w48: P2.3@200,3624.41 279.59,3704 456,3704 537,3785 735,3785 765,3815 v1(900,3815) v1(955,3815) v1(1010,3815) ; v1(1485,3832) 1485,4014 1520,4049 v1(1520,4079) 1520,4119 v1(1520.19,4120.49)
  other v1: 1484.8,3873.93
2-CELL5: C51.2 C54.1 JP7.1 P2.2 Q9.4 Q9.7 R31.2 R117.1 R118.2 R119.2 Z14.2 Z16.2 Z17.1 | length 2284.5
  Top Layer w24: JP7.1@456,3854 456,3800.35 480.05,3776.3 823.52,3776.3 838.27,3761.55 838.27,3724.89 818.38,3705 R31.2@770,3705 ; R119.2@995,4040 995,3950 1005,3940 1231.45,3940 1258.14,3913.31 1258.14,3893.51 1244.63,3880 Z17.1@1189.5,3880
  Bottom Layer w48: P2.2@200,3762.2 291.8,3854 456,3854 531,3929 568.68,3929 662,4022.32 662,4024.23 740.77,4103 781,4103 842,4164 905,4164 v1(905,4165) v1(960,4165) v1(1025,4165) ; v1(1490,4188) v1(1490,4228) 1490,4299 1515,4324 v1(1515,4396) 1515,4436 v1(1514.43,4441.04)
2-CELL6: C51.1 J4.1 P2.1 R20.1 R30.2 R113.2 R114.2 TP3.1 TP-C3.1 Z14.1 | length 3710.3
  Top Layer w12: R113.2@995,4390 995,4465 1010,4480 1595,4480 TP-C3.1@1640,4435 1640,4385 1665,4360 R114.2@1665,4330
  Top Layer w20: 200,4495 R20.1@200,4520
  Top Layer w24: P2.1@200,3900 295,3900 369.9,3974.9 369.9,4035.9 409,4075 J4.1@455,4075 ; TP3.1@510,4235 510,4142.75 456,4088.75 456,3950.35 480.05,3926.3 823.52,3926.3 838.27,3911.55 838.27,3874.89 818.38,3855 R30.2@770,3855 ; R113.2@995,4390 995,4305 1010,4290 1231.45,4290 1248.03,4273.42 1248.03,4244.55 1236.11,4232.63 1189.5,4232.63 Z14.1@1189.5,4230
  Top Layer w48: P2.1@200,3900 200,4495
  Bottom Layer w48: J4.1@455,4075 795,4415 v1(876,4415) 915,4415 v1(916,4414)
2-CONV_N: R25.1 U2.59 | length 632.9
  Top Layer w8: R25.1@2300,4295 2300,4188.07 2320,4168.07 2320,3943.56 2300.79,3924.34 U2.59@2300.79,3678.35
2-CONV_S: C76.1 R42.2 U2.21 | length 1226.2
  Top Layer w8: C76.1@2165,2650 2206.01,2650 ; R42.2@2270,2175 2270,2332.79 2207.61,2395.18 2207.61,2648.4 2206.01,2650 ; U2.21@2281.1,3221.65 2281.1,3166.17 2362.5,3084.78 2362.5,2783.47 2229.03,2650 2206.01,2650
2-CS_N: R28.1 U2.52 | length 692.7
  Top Layer w8: U2.52@2438.58,3678.35 2438.58,3783.58 2548.01,3893.01 2548.01,4233.01 2610,4295 R28.1@2615,4295
2-CS_S: C75.1 R45.2 U2.29 | length 1202.2
  Top Layer w8: U2.29@2438.58,3221.65 2438.58,3184.92 2507.93,3115.57 2507.93,2972.61 2587.41,2893.13 2587.41,2611.96 ; R45.2@2550,2175 2550,2288.83 2587.41,2326.24 2587.41,2611.96 ; C75.1@2665,2610 2621.69,2610 2619.72,2611.96 2587.41,2611.96
2-DRDY_N: C62.2 R24.1 U2.58 | length 1263
  Top Layer w8: U2.58@2320.47,3678.35 2320.47,3889.1 2341.84,3910.47 2341.84,4173.66 2366.82,4198.63 v1(2366.82,4231.82) 2366.82,4338.54 2354.98,4350.38 2354.98,4449.1 2330,4474.09 R24.1@2330,4745
  Top Layer w12: C62.2@2215,4220 2215,4226.86 2265.37,4226.86 2266.72,4225.51 v1(2266.91,4225.51)
  Bottom Layer w8: v1(2266.91,4225.51) 2310.2,4225.51 2315.67,4230.98 2316.52,4231.82 v1(2366.82,4231.82)
2-DRDY_S: R38.2 U2.22 | length 747.9
  Top Layer w8: R38.2@2260,2555 2260,2609.91 2378.5,2728.41 2378.5,3091.4 2300.79,3169.11 U2.22@2300.79,3221.65
2-FAULT_N: C64.2 R22.1 U2.56 | length 1360.9
  Top Layer w8: U2.56@2359.84,3675.39 2359.84,3877.33 2385.95,3903.43 2385.95,4021.46 2415.49,4051 v1(2415.49,4092.35) 2415.49,4227.02 2409,4233.51 2409,4589 2510,4690 R22.1@2510,4745 ; v1(2584.47,4093.69) 2635,4093.69 C64.2@2635,4090
  Bottom Layer w8: v1(2415.49,4092.35) 2483.85,4092.35 2485.18,4093.69 v1(2584.47,4093.69)
2-FAULT_S: R40.2 U2.24 | length 711
  Top Layer w8: U2.24@2340.16,3224.61 2340.16,3184.48 2440,3084.64 R40.2@2440,2555
2-LDOA: C82.1 C83.1 U2.17 | length 266.4
  Top Layer w8: v1@2201,3171 v1(2202,3172) 2202.36,3172.36 U2.17@2202.36,3224.61
  Top Layer w24: C83.1@2110,3100 2110,3171 v1@2201,3171 ; v1(2202,3172) 2202,3127 2200,3125 C82.1@2202.41,3125
2-LDOD1: C84.1 C85.1 R135.2 TP-VPROG2.1 U2.18 U2.46 | length 1633
  Top Layer w8: U2.18@2222.05,3221.65 v1@2222.05,3263.05 ; U2.46@2578.35,3558.27 2613.27,3558.27 2615,3560 ; 2660,3490 2892.96,3490 2932.96,3450 TP-VPROG2.1@3050,3450 ; v1@2660,3545 2662.55,3547.55 v1(2662.79,3547.55) ; C84.1@2718.5,3448.94 C84.1@2718.5,3450 2754.43,3414.07 2767.6,3414.07 2781.5,3400.17 R135.2@2781.5,3370
  Top Layer w12: 2615,3560 2645,3560 v1@2660,3545
  Top Layer w24: v1@2660,3545 2660,3490 2660,3450 C84.1@2715,3450 ; v1@2662.55,3547.55 2665,3550 C85.1@2740,3550
  Bottom Layer w24: v1(2222,3272) 2275.22,3272 2313.06,3234.16 2627.69,3234.16 2662.79,3269.26 v1(2662.79,3547.55)
2-REG50: C58.1 C59.1 C81.1 J5.2 J6.2 R123.2 R126.2 RT3.2 RT4.2 U2.32 | length 5811
  Top Layer w8: v1(2319.03,2784.19) C58.1@2319.03,2827.53 ; 2497.64,3186.36 U2.32@2497.64,3224.61 ; 2712,2957 2797,2872 ; R126.2@2835,2928.5 2835,2896 2825,2886 2811,2886 2797,2872 ; R123.2@2853.5,2840 2810,2840 2797,2853 2797,2872 ; RT4.2@4175,5361.5 4175,5366 4216,5407 4265,5407 J6.2@4300,5372 ; J5.2@4425,5371 4457,5403 4508.5,5403 RT3.2@4550,5361.5
  Top Layer w15: 2497.64,3186.36 2497.64,3166.36 2532.64,3166.36 2552,3147 C81.1@2552,3105 2634,3105 2712,3027 2712,2957
  Top Layer w24: C59.1@2208.97,4054.47 v1(2208.97,4097.81)
  Bottom Layer w8: v1@2209.82,4102.12 2209.82,4071.41 2366.13,3915.09 2938.76,3915.09 ; v1(2319.03,2784.19) 2319.03,3026.1 2457.93,3165 2745,3165 2938.76,3358.76 2938.76,3915.09 ; J6.2@4300,5372 4343.63,5372 4363.7,5351.93 ; J5.2@4425,5371 4382.77,5371 4363.7,5351.93 ; 2938.76,3915.09 3199.83,3915.09 4363.7,5078.97 4363.7,5351.93
  other v1: 2498,3166
2-SCLK_N: R26.1 U2.55 | length 641.7
  Top Layer w8: U2.55@2379.53,3678.35 2379.53,3863.98 2409.05,3893.5 2409.05,4000.58 2440,4031.53 R26.1@2440,4295
2-SCLK_S: C73.1 R43.2 U2.26 | length 1307.6
  Top Layer w8: U2.26@2379.53,3221.65 2379.53,3171.02 2457.54,3093.01 2457.54,2864.39 2475.48,2846.46 v1(2475.48,2769.55) 2475.48,2407.24 2400,2331.77 R43.2@2400,2175 ; v1(2615.39,2769.55) 2665,2769.55 C73.1@2665,2770
  Bottom Layer w8: v1(2475.48,2769.55) v1(2615.39,2769.55)
2-SDI_N: R27.1 U2.53 | length 660.6
  Top Layer w8: U2.53@2418.9,3678.35 2418.9,3807.9 2525,3914 R27.1@2525,4295
2-SDI_S: C74.1 R44.2 U2.28 | length 1246.9
  Top Layer w8: U2.28@2418.9,3221.65 2418.9,3181.98 2491.93,3108.95 2491.93,2965.98 2559.43,2898.49 v1(2559.43,2691.49) 2559.43,2596.03 2560,2595.46 2560,2396.77 2475,2311.77 R44.2@2475,2175 ; v1(2627.91,2690.76) 2665,2690.76 C74.1@2665,2690
  Bottom Layer w8: v1(2559.43,2691.49) 2593.3,2691.49 2594.04,2690.76 v1(2627.91,2690.76)
2-SDO_N: C65.2 R23.1 U2.54 | length 1324.5
  Top Layer w8: U2.54@2399.21,3678.35 2399.21,3844.21 2464.24,3909.24 v1(2464.24,4015.4) 2487.02,4044.19 2487.02,4540 2600,4652.98 R23.1@2600,4745 ; v1(2585.65,4015.4) 2635,4015.4 C65.2@2635,4010
  Bottom Layer w8: v1(2464.24,4015.4) v1(2585.65,4015.4)
2-SDO_S: R41.2 U2.27 | length 720.8
  Top Layer w8: U2.27@2399.21,3221.65 2399.21,3177.25 2475.09,3101.37 2475.09,2926.39 2530,2871.47 R41.2@2530,2555
2-VBAT: C50.1 C62.1 C63.1 C64.1 C65.1 C79.1 R29.1 R115.2 U2.63 U2.64 Z15.2 | length 2850.2
  Top Layer w8: U2.64@2202.36,3678.35 2202.36,3715.49 2207.93,3721.06 v1(2203,3726) 2222.05,3706.95 U2.63@2222.05,3678.35 ; v1(2570.77,3789.14) 2610.4,3789.14 2765.65,3944.39 2765.65,4009.95 2765.45,4010.14 ; C65.1@2705,4010 2740.66,4010 2740.8,4010.14 2765.45,4010.14 ; C64.1@2705,4090 2740.32,4090 2741.13,4090.81 2765.45,4090.81 ; C63.1@2705,4170 2750.09,4170 2765.45,4154.64 2765.45,4090.81 ; 2765.45,4010.14 2765.45,4090.81
  Top Layer w15: 1982.5,4325 1935,4325 1915,4305 1915,4160 1945,4130 1945,4080 2005,4020 2005,3980
  Top Layer w24: Z15.2@1825,3905.5 1825,3859.29 1846,3838.29 1930,3838.29 ; R115.2@1930,3915 1930,3838.29 ; 2005,3980 2005,3805 ; R29.1@2030,4477.91 2030,4417 1982.5,4369.5 1982.5,4325 2125,4325 2145,4305 C62.1@2145,4220 ; C50.1@2060,3855 2061.83,3855 2061.83,3805 ; v1(2203,3726) 2203,3745.86 2180,3768.86 2180,3805 2061.83,3805 ; 1930,3838.29 1930,3824.76 1949.76,3805 2005,3805 ; 2005,3805 2061.83,3805
  Bottom Layer w8: v1(2203,3726) 2210.96,3724.09 2392.31,3724.09 2457.36,3789.14 v1(2570.77,3789.14)
2-VC0: C6.1 C7.2 C8.2 C9.1 C48.2 C50.2 C52.2 C55.2 C60.2 C67.2 C70.2 C71.2 C73.2 C74.2 C75.2 C76.2 C77.2 C78.2 C79.2 C80.2 C81.2 C82.2 C83.2 C84.2 C85.2 JP12.1 P2.7 Q12.4 Q12.7 Q15.4 Q15.7 R36.1 R36.2 R37.2 R46.2 R141.2 R146.2 R149.1 TP4.1 TPTP-VSS1.1 U2.13 U2.14 U2.15 U2.25 U2.33 U2.34 U2.35 U2.49 U2.50 U2.65 Z15.1 Z25.2 Z26.2 | length 4407.5
  Top Layer w8: v1(2052.52,2650) C76.2@2095,2650 ; U2.25@2359.84,3221.65 2359.84,3266.16 v1(2359.99,3266.16) ; U2.50@2477.95,3678.35 2477.95,3706.03 2485.57,3713.65 2485.57,3733.65 v1(2487.84,3733.65) 2490.02,3733.65 2490.02,3713.65 2497.64,3706.03 U2.49@2497.64,3678.35 ; U2.33@2578.35,3302.36 2623.27,3302.36 ; U2.34@2578.35,3322.05 2621.16,3322.05 2621.3,3318.29 2623.27,3318.29 ; U2.35@2578.35,3341.73 2616.79,3341.73 2623.27,3335.26 2623.27,3318.29 ; v1(2623.27,3274.99) 2623.27,3302.36 ; C75.2@2735,2610 v1(2777.48,2610) ; C74.2@2735,2690 v1(2777.48,2690) ; C73.2@2735,2770 v1(2777.48,2770) ; C84.2@2783,3450 2783,3449.69 v1(2825.48,3449.69) ; C85.2@2820,3550 v1(2862.48,3550) ; C70.2@2863,3639 2863,3638.69 v1(2905.48,3638.69) ; C71.2@2863,3791 2863,3790.69 v1(2905.48,3790.69) ; R146.2@2865,3715 v1(2907.48,3715) ; R141.2@2865,3865 2865,3864.69 v1(2907.48,3864.69) ; 2623.27,3302.36 2623.27,3318.29
  Top Layer w10: U2.15@2121.65,3322.05 2089.79,3322.05 v1(2067.46,3329.38) 2079.83,3341.73 U2.14@2121.65,3341.73
  Top Layer w20: v1(1658,3679) C48.2@1700.5,3679 ; v1(1659,3455) C60.2@1701.5,3455 ; v1(1659,3529) C55.2@1701.5,3529 ; v1(1660,3378) C67.2@1702.5,3378 ; v1(1660,3619) 1689.5,3619 C52.2@1701.5,3607
  Top Layer w24: v1(634,4467) 634,4517.5 C6.1@635,4518.5 ; Z15.1@1828,4076 v1(1828.03,4111.43) ; v1(2000.97,2970.57) 2000.97,3019 C77.2@2002,3019 ; C50.2@2060,3932 v1(2060.03,3967.43) ; v1(2108.97,2971.57) 2108.97,3020 C83.2@2110,3020 ; C79.2@2180,3868 2181.03,3868 v1(2181.03,3916.43) ; v1(2200.97,3010.57) 2200.97,3059 C82.2@2202,3059 ; v1(2550.97,2979.57) C81.2@2551,3015 ; C9.1@3135.04,2313 v1(3135.04,2350.89) ; v1(3154,4463) C7.2@3154,4508
  Top Layer w40: P2.7@200,3073.23 209.77,3083 317.74,3083 R36.2@323.01,3088.27 329.74,3095 445,3095 JP12.1@454,3104 454,3044 525,2973 TP4.1@525,2875 ; R37.2@205,2311.5 P2.7@205,3068.23
  Bottom Layer w48: JP12.1@456,3104 522,3170 ; 522,3182 586,3182 647,3121 647,2523 730,2440 805,2440 860,2385 v1(915,2385) v1(970,2385) v1(1020,2385) ; v1(1490,2366) 1490,2493 1515,2518 v1(1515,2646)
  other v1: 2536,1611 2545,1945 2515,2020 733,2327 1800,2400 1950,2400 2100,2400 2700,2400 2850,2400 3000,2400 3250,2400 1488,2406 3350,2500 100,2600 1516,2606 3350,2700 100,2800 305,2871.31 342,2871.31 3350,2900 305,2922.31 342,2922.31 3005,2935 100,3000 2750,3025 1750,3050 1600,3100 3350,3100 100,3200 1803,3231 3350,3300 1802,3304 100,3400 3350,3500 100,3600 3350,3700 100,3800 3350,3900 100,4000 750,4050 2900,4050 1600,4075 750,4150 100,4200 3350,4250 1875,4345 100,4400 450,4450 2150,4450 2750,4450 3000,4450 3350,4450
  other v2: 2247.64,3347.64 2298.82,3347.64 2350,3347.64 2401.18,3347.64 2452.36,3347.64 2247.64,3398.82 2298.82,3398.82 2350,3398.82 2401.18,3398.82 2452.36,3398.82 2247.64,3450 2298.82,3450 2350,3450 2401.18,3450 2452.36,3450 2247.64,3501.18 2298.82,3501.18 2350,3501.18 2401.18,3501.18 2452.36,3501.18 2247.64,3552.36 2298.82,3552.36 2350,3552.36 2401.18,3552.36 2452.36,3552.36
2-VC1: C68.2 C78.1 R145.1 U2.11 | length 1056.2
  Top Layer w8: R145.1@1601.5,2800 1649.25,2800 1698.45,2849.2 1698.45,3234.88 1806.95,3343.38 1909.99,3343.38 ; C78.1@1911.5,3305 C68.2@1911.5,3380 1978,3380 1998.79,3400.79 U2.11@2124.61,3400.79
2-VC2: C61.2 C67.1 C68.1 R138.1 U2.9 | length 997.1
  Top Layer w8: R138.1@1601.5,3175 1659.81,3175 1674.37,3189.56 1674.37,3265.59 1628.52,3311.44 1628.52,3389.95 1654.63,3416.06 1805,3416.06 ; C67.1@1761.5,3380 1805,3380 ; C68.1@1848.5,3380 1805,3380 ; C61.2@1911.5,3455 1942.29,3455 ; U2.9@2124.61,3440.16 2027.52,3440.16 2012.68,3455 1942.29,3455 ; 1805,3380 1805,3416.06 ; 1805,3416.06 1930.23,3416.06 1942.29,3428.12 1942.29,3455
2-VC3: C56.2 C60.1 C61.1 R131.1 U2.7 | length 759.7
  Top Layer w8: R131.1@1596.5,3500 1599.43,3497.07 1805,3497.07 ; C60.1@1761.5,3455 1805,3455 ; C61.1@1848.5,3455 1805,3455 ; C56.2@1911.5,3530 1959,3530 ; U2.7@2124.61,3479.53 2054.19,3479.53 2003.72,3530 1959,3530 ; 1805,3455 1805,3497.07 ; 1805,3497.07 1959,3497.07 1959,3530
2-VC4: C53.2 C55.1 C56.1 R122.1 U2.5 | length 1014.9
  Top Layer w8: R122.1@1601.5,3875 1601.5,3641.5 1677,3566 1805.82,3566 ; C55.1@1761.5,3530 1807,3530 ; C56.1@1848.5,3530 1807,3530 ; C53.2@1911.5,3605 1949,3605 ; U2.5@2124.61,3518.9 2062.2,3518.9 2019.1,3562 2010.07,3562 1967.07,3605 1949,3605 ; 1805.82,3566 1934.26,3566 1949,3580.74 1949,3605 ; 1805.82,3566 1805.82,3531.19 1807,3530